# Altium PCB powermodule.PcbDoc (part 1 of 2)
Units mil, origin at the board's own origin, x right, y up, seen from the top; angles counter-clockwise.
Board outline 3937.01 x 1771.65 mil, 2 copper layers (Top, Bottom); 128 components, 96 nets, 567 pads, 424 vias.
Unrouted connection lines stored in the file: 69.
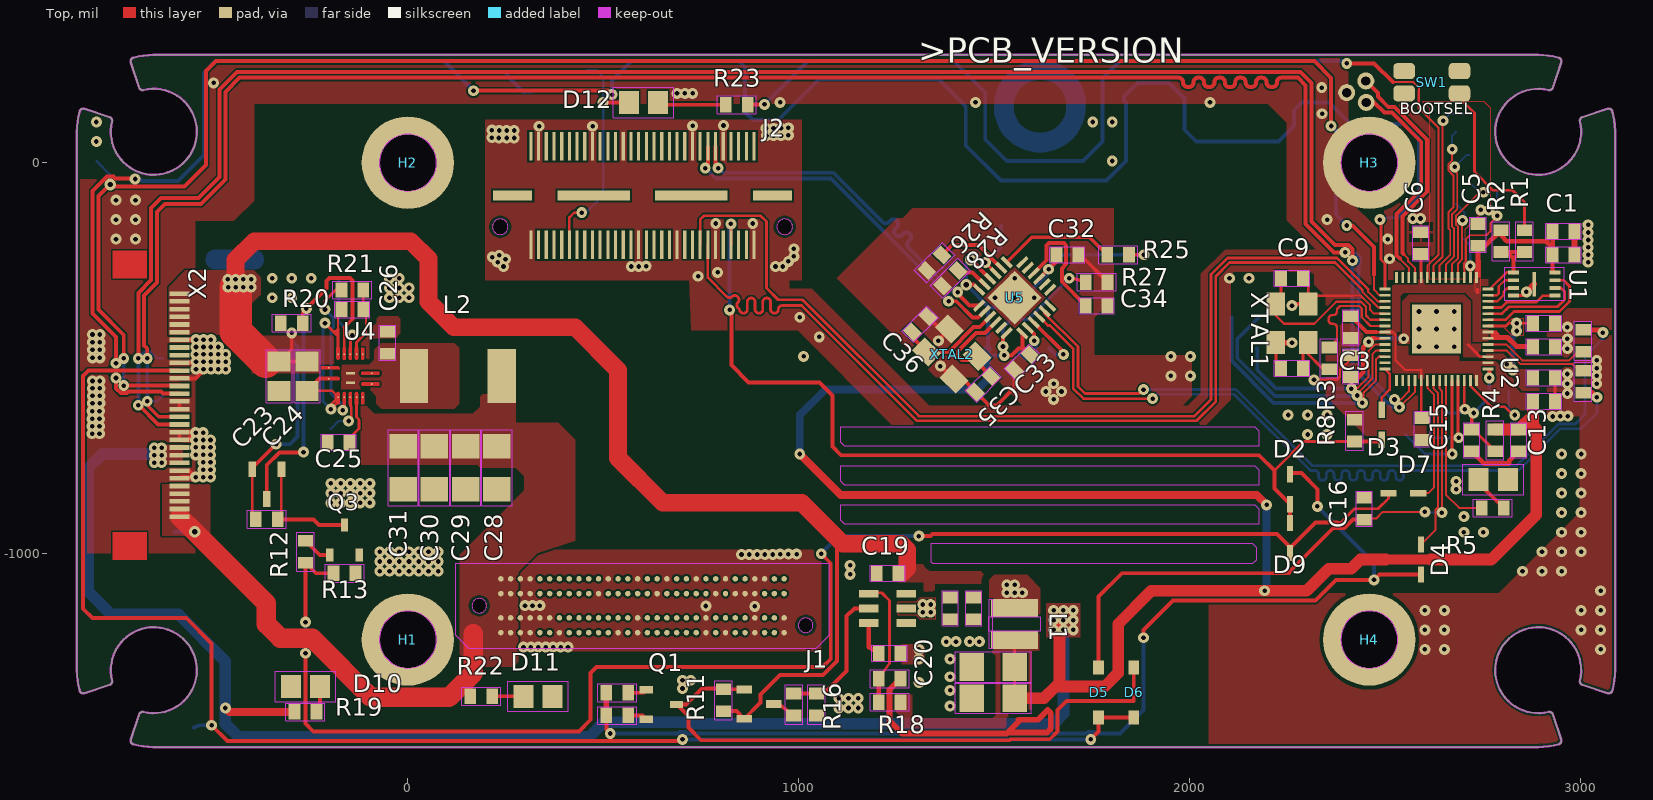
[diagram p0: Top view]
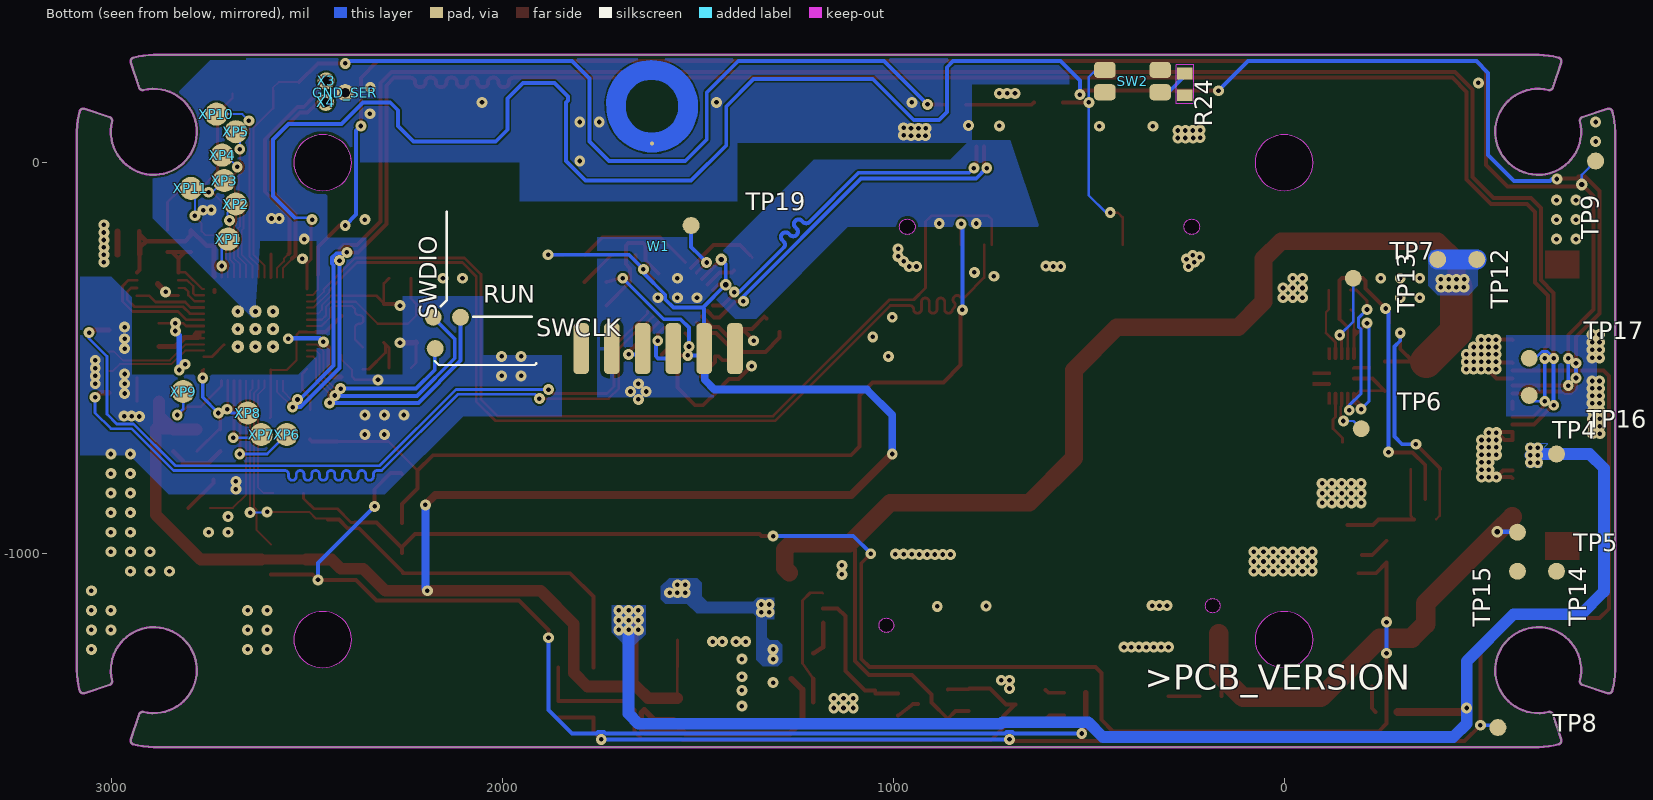
[diagram p1: Bottom view, seen from below]

## Layer stack, top to bottom
Top Solder: solder mask 0.4, Solder Resist, Dk 3.5
Top: signal copper 1.378
Dielectric 1: dielectric 12.6, FR-4, Dk 4.8
Bottom: signal copper 1.378
Bottom Solder: solder mask 0.4, Solder Resist, Dk 3.5

## Board outline
2945.67,268.85 cw(c2942.63,259.48) 2951.96,256.32 2930.7,192.49 cw(c2921.37,195.61) 2919.28,186 2918.49,186.19 ccw(c2892.95,79.19) 2858.19,-25.17 2867.42,-27.8 ccw(c2892.96,79.19) 2999.82,105.29 cw(c3009.38,107.61) 3006.27,116.94 3070.13,138.21 cw(c3073.25,128.87) 3082.79,131.29 cw(c2892.92,79.2) 3089.06,96.32 3089.81,79.19 3089.81,-1298.76 cw(c2892.96,-1298.74) 3082.5,-1351.89 3082.47,-1351.88 cw(c3073.24,-1348.44) 3070.13,-1357.78 3006.27,-1336.51 cw(c3009.39,-1327.17) 2999.82,-1324.83 ccw(c2892.96,-1298.75) 2792.02,-1255.03 2788.59,-1263.99 ccw(c2892.96,-1298.76) 2919.03,-1405.63 cw(c2921.37,-1415.19) 2930.71,-1412.07 2951.98,-1475.94 cw(c2942.64,-1479.05) 2946.82,-1487.96 2946.88,-1488.08 cw(c2892.95,-1298.76) 2892.96,-1495.61 -650.35,-1495.61 -652.14,-1495.6 cw(c-650.37,-1298.76) -702.64,-1488.54 cw(c-700.03,-1479.05) -709.37,-1475.94 -688.1,-1412.07 cw(c-678.76,-1415.19) -676.42,-1405.63 ccw(c-650.35,-1298.76) -545.98,-1263.99 -549.41,-1255.03 ccw(c-650.35,-1298.75) -757.22,-1324.83 cw(c-766.78,-1327.17) -763.66,-1336.51 -827.53,-1357.78 cw(c-830.64,-1348.44) -840.13,-1351.05 cw(c-650.38,-1298.77) -847.2,-1298.76 -847.2,79.19 cw(c-650.34,79.21) -840.13,131.49 cw(c-830.64,128.87) -827.53,138.21 -763.66,116.94 cw(c-766.78,107.61) -757.22,105.27 ccw(c-650.35,79.19) -549.41,35.46 -545.98,44.43 ccw(c-650.34,79.19) -676.42,186.06 cw(c-678.76,195.63) -688.1,192.51 -709.37,256.37 cw(c-700.03,259.48) -702.64,268.97 cw(c-650.33,79.2) -652.14,276.04 -650.35,276.04 2892.96,276.04 cw(c2892.96,79.2)
cut-out: 0,-72.83 ccw(c0,0) 72.83,0 ccw(c0,0) 0,72.84 ccw(c0,0) -72.84,0 ccw(c0,0)
cut-out: 0,-1293.31 ccw(c0,-1220.48) 72.83,-1220.48 ccw(c0,-1220.48) 0,-1147.64 ccw(c0,-1220.48) -72.84,-1220.48 ccw(c0,-1220.48)
cut-out: 2460.63,-1293.31 ccw(c2460.63,-1220.48) 2533.47,-1220.48 ccw(c2460.63,-1220.48) 2460.63,-1147.64 ccw(c2460.63,-1220.48) 2387.8,-1220.48 ccw(c2460.63,-1220.48)
cut-out: 2460.63,-72.83 ccw(c2460.63,0) 2533.47,0 ccw(c2460.63,0) 2460.63,72.84 ccw(c2460.63,0) 2387.8,0 ccw(c2460.63,0)
cut-out: 236.4,-183.86 ccw(c236.4,-163.86) 256.4,-163.86 ccw(c236.4,-163.86) 236.4,-143.86 ccw(c236.4,-163.86) 216.4,-163.86 ccw(c236.4,-163.86)
cut-out: 964.4,-183.86 ccw(c964.4,-163.86) 984.4,-163.86 ccw(c964.4,-163.86) 964.4,-143.86 ccw(c964.4,-163.86) 944.4,-163.86 ccw(c964.4,-163.86)
cut-out: 182.69,-1152.56 ccw(c182.69,-1133.86) 201.39,-1133.86 ccw(c182.69,-1133.86) 182.69,-1115.16 ccw(c182.69,-1133.86) 163.99,-1133.86 ccw(c182.69,-1133.86)
cut-out: 1018.13,-1202.56 ccw(c1018.13,-1183.86) 1036.83,-1183.86 ccw(c1018.13,-1183.86) 1018.13,-1165.16 ccw(c1018.13,-1183.86) 999.43,-1183.86 ccw(c1018.13,-1183.86)

## Design rules (kind name [scope] priority, off if disabled: settings)
BoardOutlineClearance mdCopperDimension [All] p1: gap=10 ignorepadtopadclearanceinfootprint=FALSE except(0: Arc-SplitContinuation Track-SplitContinuation SMDPad-SplitContinuation THPad-SplitContinuation Via-SplitContinuation Fill-SplitContinuation Poly-SplitContinuation Region-SplitContinuation Text-SplitContinuation; 7.87: Poly-OutlineEdge Poly-CavityEdge Poly-CutoutEdge Poly-SplitBarrior)
Clearance Clearance_for_PolygonClass_Isolate_16 [InPolygonClass('Isolate_16') vs IsArc Or IsTrack Or IsPad Or IsVia Or IsFill Or IsRegion Or IsText] p1: gap=16 ignorepadtopadclearanceinfootprint=FALSE
Clearance Clearance_for_PolygonClass_Isolate_20 [InPolygonClass('Isolate_20') vs IsArc Or IsTrack Or IsPad Or IsVia Or IsFill Or IsRegion Or IsText] p2: gap=20 ignorepadtopadclearanceinfootprint=FALSE
Clearance Clearance_for_PolygonClass_Isolate_10 [InPolygonClass('Isolate_10') vs IsArc Or IsTrack Or IsPad Or IsVia Or IsFill Or IsRegion Or IsText] p3: gap=10 ignorepadtopadclearanceinfootprint=FALSE
Clearance "Clearance (Same Net)" [All] p4: gap=5 ignorepadtopadclearanceinfootprint=FALSE
Clearance [All] p5: gap=5 ignorepadtopadclearanceinfootprint=FALSE
DiffPairsRouting DiffPair_DiffPairsRouting [All] p1: maxlimit=10 minlimit=10 mostfreqgap=10 toplayer_minwidth=15 toplayer_maxwidth=15 toplayer_prefwidth=15 bottomlayer_minwidth=15 bottomlayer_maxwidth=15 bottomlayer_prefwidth=15 maxuncoupledlength=500
DiffPairsRouting [All] p2: maxlimit=10 minlimit=10 mostfreqgap=10 toplayer_minwidth=15 toplayer_maxwidth=15 toplayer_prefwidth=15 bottomlayer_minwidth=15 bottomlayer_maxwidth=15 bottomlayer_prefwidth=15 maxuncoupledlength=500
HoleSize "HoleSize_For_NetClass_dif pairs" [InNetClass('dif pairs')] p1: absolutevalues=TRUE maxlimit=0 minlimit=0 maxpercent=80.000 minpercent=20.000
HoleSize [All] p2: absolutevalues=TRUE maxlimit=100000 minlimit=11.81 maxpercent=80.000 minpercent=20.000
HoleToHoleClearance mdDrill [All] p1: gap=6 allowstackedmicrovias=TRUE
MatchedLengths DiffPair_MatchedLengths [All] p1: tolerance=1000 checknetsindiffpair=FALSE checkdiffpairvsdiffpair=TRUE checkxsignals=TRUE checkothers=TRUE
MinimumSolderMaskSliver [All] p1 off: minsoldermaskwidth=10
PasteMaskExpansion Expansion_SMDPaste_OFF [InPadClass('SMDPaste_OFF')] p1: expansion=0
PasteMaskExpansion mlMinCreamFrame [All] p2: expansion=0
PolygonConnect PolygonConnect_For_PolygonThermal_ON_Width100000_Gap100000 [InPolygonClass('PolygonThermal_ON_Width100000_Gap100000') vs Not IsVia] p1: connectstyle=Relief reliefconductorwidth=10 reliefentries=4 polygonreliefangle="90 Angle" airgapwidth=10
PolygonConnect PolygonConnect_For_PolygonThermal_ON_Width50000_Gap100000 [InPolygonClass('PolygonThermal_ON_Width50000_Gap100000') vs Not IsVia] p2: connectstyle=Relief reliefconductorwidth=5 reliefentries=4 polygonreliefangle="90 Angle" airgapwidth=10
PolygonConnect PolygonConnect_For_PolygonThermal_ON_Width60000_Gap100000 [InPolygonClass('PolygonThermal_ON_Width60000_Gap100000') vs Not IsVia] p3: connectstyle=Relief reliefconductorwidth=6 reliefentries=4 polygonreliefangle="90 Angle" airgapwidth=10
PolygonConnect PolygonConnect_For_PolygonThermal_ON_Width200000_Gap100000 [InPolygonClass('PolygonThermal_ON_Width200000_Gap100000') vs Not IsVia] p4: connectstyle=Relief reliefconductorwidth=20 reliefentries=4 polygonreliefangle="90 Angle" airgapwidth=10
PolygonConnect PolygonConnect_For_PolygonThermal_ON_Width70000_Gap100000 [InPolygonClass('PolygonThermal_ON_Width70000_Gap100000') vs Not IsVia] p5: connectstyle=Relief reliefconductorwidth=7 reliefentries=4 polygonreliefangle="90 Angle" airgapwidth=10
PolygonConnect PolygonConnect_For_PolygonThermal_OFF [InPolygonClass('PolygonThermal_OFF')] p6: connectstyle=Direct reliefconductorwidth=10 reliefentries=4 polygonreliefangle="90 Angle" airgapwidth=10
PolygonConnect ThermalVias [IsVia] p7: connectstyle=Direct reliefconductorwidth=10 reliefentries=4 polygonreliefangle="90 Angle" airgapwidth=10
PolygonConnect [All] p8: connectstyle=Relief reliefconductorwidth=10 reliefentries=4 polygonreliefangle="90 Angle" airgapwidth=10
RoutingVias [All] p1: holewidth=11.81 width=17.81 viastyle="Through Hole" minholewidth=11.81 minwidth=17.81 maxholewidth=100 maxwidth=100
SolderMaskExpansion Expansion_SMDSolder_OFF [InPadClass('SMDSolder_OFF')] p1: expansion=0 istentingtop=FALSE
SolderMaskExpansion mlMinStopFrame [All] p2: expansion=4 istentingtop=FALSE
Width "Width_For_NetClass_dif pairs" [InNetClass('dif pairs')] p1: maxlimit=10 minlimit=99999 preferedwidth=5 toplayer_minwidth=0 bottomlayer_minwidth=0 minimp=50.000000 maximp=50.000000 favimp=50.000000
Width [All] p2: maxlimit=10 minlimit=5 preferedwidth=5
25 further rules are at their usual default settings.

## Classes and differential pairs
polygon class PolygonThermal_ON_Width100000_Gap100000: Polygon_13_Net_GND
polygon class PolygonThermal_ON_Width50000_Gap100000: Polygon_2_Net_+1V1 Polygon_3_Net_+1V1 Polygon_15_Net_GND Polygon_16_Net_GND
polygon class PolygonThermal_ON_Width200000_Gap100000: Polygon_6_Net_+3V3
polygon class PolygonThermal_ON_Width70000_Gap100000: Polygon_3_Net_N$8 Polygon_7_Net_+3V3 Polygon_8_Net_+3V3 Polygon_8_Net_GND Polygon_10_Net_GND Polygon_11_Net_GND Polygon_12_Net_GND Polygon_14_Net_GND Polygon_18_Net_GND
polygon class PolygonThermal_OFF: Polygon_1_Net_+1V1 Polygon_1_Net_+3V3 Polygon_1_Net_+5V Polygon_1_Net_+12V Polygon_1_Net_GND Polygon_1_Net_N$2 Polygon_1_Net_N$8 Polygon_1_Net_N$19 Polygon_2_Net_+3V3 Polygon_2_Net_+5V Polygon_2_Net_+12V Polygon_2_Net_N$8 Polygon_3_Net_+3V3 Polygon_3_Net_+5V Polygon_3_Net_+12V Polygon_4_Net_+3V3 Polygon_4_Net_+12V Polygon_4_Net_GND Polygon_4_Net_N$8 Polygon_5_Net_+3V3 Polygon_5_Net_GND Polygon_5_Net_N$8 Polygon_7_Net_GND Polygon_9_Net_GND Polygon_17_Net_GND
polygon class Isolate_20: Polygon_1_Net_+12V
polygon class Isolate_10: Polygon_1_Net_N$8
pad class SMDSolder_OFF: W1-P$1 X2-1 X2-2 X2-3 X2-4 X2-5 X2-6 X2-7 X2-8 X2-9 X2-10 X2-11 X2-12 X2-13 X2-14 X2-15 X2-16 X2-17 X2-18 X2-19 X2-20 X2-21 X2-22 X2-23 X2-24 X2-25 X2-26 X2-27 X2-28 X2-29 X2-30
pad class SMDPaste_OFF: -TP H1-P$1 H2-P$1 H3-P$1 H4-P$1 SWCLK-TP SWDIO-TP TP4-TP TP5-TP TP6-TP TP7-TP TP8-TP TP9-TP TP12-TP TP13-TP TP14-TP TP15-TP TP16-TP TP17-TP TP19-TP U2-57 W1-P$1 X2-1 X2-2 X2-3 X2-4 X2-5 X2-6 X2-7 X2-8 X2-9 X2-10 X2-11 X2-12 X2-13 X2-14 X2-15 X2-16 X2-17 X2-18 X2-19 X2-20 X2-21 X2-22 X2-23 X2-24 X2-25 X2-26 X2-27 X2-28 X2-29 X2-30
net class "dif pairs": D_N D_P USB_D_N USB_D_P

## Components (designator, comment, footprint, x,y, rotation, side; value= is the part's Value field where it differs from the comment)
C1 "100nF" C0603 2957.8,-175.61 r0 top
C2 "2u2F" C0603 2957.8,-235.61 r0 top
C3 "100nF" C0603 2412.8,-420.61 r90 top
C4 "2u2F" C0603 2907.8,-550.61 r180 top
C5 "100nF" C0603 2738.8,-184.61 r90 top
C6 "100nF" C0603 2592.8,-205.61 r90 top
C7 "2u2F" C0603 2907.8,-610.61 r180 top
C8 "100nF" C0603 2412.8,-520.61 r90 top
C9 "10pF" C0603 2262.8,-295.61 r180 top
C10 "10pF" C0603 2262.8,-525.61 r180 top
C11 "2u2F" C0603 2722.8,-710.61 r90 top
C12 "100nF" C0603 2907.8,-470.61 r0 top
C13 "100nF" C0603 2842.8,-710.61 r270 top
C14 "100nF" C0603 2907.8,-410.61 r180 top
C15 "100nF" C0603 2595.8,-681.61 r90 top
C16 "100nF" C0603 2447.8,-885.61 r90 top
C17 "10uF" C0603 1387.8,-1140.61 r270 top
C18 "10uF" C0603 1447.8,-1140.61 r270 top
C19 "100nF" C0603 1227.8,-1050.61 r180 top
C20 "100nF" C0603 1232.8,-1255.61 r0 top
C21 "22uF" C1206 1497.8,-1370.61 r180 top
C22 "22uF" C1206 1497.8,-1290.61 r180 top
C23 "10uF" C0805 -329.44,-546.4 r270 top
C24 "10uF" C0805 -257.71,-546.4 r270 top
C25 "4u7F" C0603 -177.2,-715.61 r180 top
C26 "100nF" C0603 -52.2,-460.61 r270 top
C27 "2u2F" C0603 -142.2,-375.61 r180 top
C28 "22uF" C1206 227.8,-780.61 r270 top
C29 "22uF" C1206 147.8,-780.61 r270 top
C30 "22uF" C1206 67.8,-780.61 r270 top
C31 "22uF" C1206 -12.2,-780.61 r270 top
C32 "1uF" C0603 1687.8,-235.61 r0 top
C33 "100nF" C0603 1572.8,-510.61 r225 top
C34 "1uF" C0603 1762.8,-365.61 r0 top
C35 "10pF" C0603 1472.8,-566.61 r225 top
C36 "10pF" C0603 1310.8,-413.61 r225 top
D1 "YL" LED_0805 2777.8,-810.61 r0 top
D2 "1N4148WS" SOD323_NEX-L 2257.8,-835.61 r270 top
D3 "1N4148WS" SOD323_NEX-L 2492.8,-670.61 r90 top
D4 "1N4148WS" SOD323_NEX-L 2592.8,-1015.61 r90 top
D5 "" SOD-123_ONS-L 1767.8,-1355.61 r90 top
D6 "" SOD-123_ONS-L 1857.8,-1355.61 r90 top
D7 "1N4148WS" SOD323_NEX-L 2547.8,-845.61 r0 top
D9 "1N4148WS" SOD323_NEX-L 2257.8,-960.61 r90 top
D10 "GN" LED_0805 -262.2,-1340.61 r180 top
D11 "BL" LED_0805 332.8,-1365.61 r0 top
D12 "YL" LED_0805 602.8,154.39 r180 top
GND_SER "" TH-0.75/0.6 2402.8,179.39 r180 bottom
H1 "" SMT_SPACER_5MMX2.5M 0,-1220.48 r0 top
H2 "" SMT_SPACER_5MMX2.5M 0,0 r0 top
H3 "" SMT_SPACER_5MMX2.5M 2460.63,0 r0 top
H4 "" SMT_SPACER_5MMX2.5M 2460.63,-1220.48 r0 top
J1 "ADM6-30-01.5-L-4-2-A-TR" SAMTEC_ADM6-30-01.5-L-4-2-A-TR 600.41,-1133.86 r180 top
J2 "QTH-030-01-L-D-ACONN_QTH-030-02-L-D-A-K-FR_S00" CONN_QTH-030-02-L-D-A-K-FR_S00 600.4,-83.86 r0 top
L1 "VLS3012HBX-3R3MIND_VLS3012HBX-3R3M_TDK-L" IND_VLS3012HBX-3R3M_TDK-L 1552.8,-1180.61 r90 top
L2 "" HA72L-06301R5LFTR 127.8,-545.61 r180 top
Q1 "2N7002,215TO-236AB_NEX-L" TO-236AB_NEX-L 648.8,-1386.61 r270 top
Q2 "SI2301CDS-T1-GE3TO-236_VIS-L" TO-236_VIS-L 898.8,-1385.61 r270 top
Q3 "2N7002,215TO-236AB_NEX-L" TO-236AB_NEX-L -162.2,-965.61 r0 top
Q4 "SI2301CDS-T1-GE3TO-236_VIS-L" TO-236_VIS-L -361.2,-822.61 r180 top
R1 "1K" R0603 2857.8,-200.61 r270 top
R2 "10k" R0603 2797.8,-200.61 r90 top
R3 "1K" R0603 2357.8,-500.61 r270 top
R4 "200R" R0603 2782.8,-710.61 r90 top
R5 "200R" R0603 2776.8,-883.61 r180 top
R6 "27R" R0603 3007.8,-560.61 r270 top
R7 "27R" R0603 3007.8,-455.61 r90 top
R8 "10k" R0603 2422.8,-685.61 r270 top
R9 "4k7" R0603 535.8,-1356.61 r180 top
R10 "100k" R0603 535.8,-1414.61 r0 top
R11 "100k" R0603 807.8,-1375.61 r90 top
R12 "4k7" R0603 -262.2,-995.61 r270 top
R13 "100k" R0603 -162.2,-1050.61 r0 top
R14 "100k" R0603 -361.2,-912.61 r0 top
R15 "10k" R0603 987.8,-1386.61 r90 top
R16 "100k" R0603 1045.8,-1386.61 r90 top
R17 "10k" R0603 1232.8,-1320.61 r180 top
R18 "33k2" R0603 1232.8,-1380.61 r0 top
R19 "200R" R0603 -262.2,-1405.61 r180 top
R20 "100k" R0603 -297.2,-410.61 r0 top
R21 "100k" R0603 -142.2,-325.61 r0 top
R22 "200R" R0603 187.8,-1365.61 r180 top
R23 "200R" R0603 841.8,148.39 r0 top
R24 "1K" R0603 253.8,200.39 r270 bottom
R25 "50k" R0603 1817.8,-235.61 r0 top
R26 "50k" R0603 1347.8,-255.61 r225 top
R27 "12k" R0603 1762.8,-305.61 r0 top
R28 "50k" R0603 1387.8,-295.61 r225 top
SW1 "" EVQ-P7J01P 2549.8,177.39 r0 top
SW2 "FASTBOOT" EVQ-P7J01P 458.8,180.39 r180 bottom
SWCLK "TPTP11R" TP11R 2172.8,-475.61 r90 bottom
SWDIO "TPTP11R" TP11R 2177.8,-395.61 r270 bottom
TP4 "TPTP11R" TP11R -697.2,-745.61 r180 bottom
TP5 "TPTP11R" TP11R -597.2,-945.61 r180 bottom
TP6 "TPTP11R" TP11R -197.2,-680.61 r180 bottom
TP7 "TPTP11R" TP11R -177.2,-295.61 r180 bottom
TP8 "TPTP11R" TP11R -547.2,-1445.61 r180 bottom
TP9 "TPTP11R" TP11R -797.2,4.39 r180 bottom
TP11 "TPTP11R" TP11R 2107.8,-395.61 r270 bottom
TP12 "TPTP11R" TP11R -493.2,-247.61 r90 bottom
TP13 "TPTP11R" TP11R -393.2,-247.61 r90 bottom
TP14 "TPTP11R" TP11R -697.2,-1045.61 r270 bottom
TP15 "TPTP11R" TP11R -597.2,-1045.61 r270 bottom
TP16 "TPTP11R" TP11R -627.2,-595.61 r270 bottom
TP17 "TPTP11R" TP11R -627.2,-500.61 r270 bottom
TP19 "TPTP11R" TP11R 1517.8,-160.61 r180 bottom
U1 "W25Q16JVUXIQW25Q16JVUXIQ_WIN-L" W25Q16JVUXIQ_WIN-L 2882.8,-310.61 r0 top
U2 "RP2040" RP2040TR7_RPI-L 2632.8,-425.61 r270 top
U3 "TPS563201DDCR" DDC0006A_L 1227.8,-1140.61 r180 top
U4 "RT7291AGQUF" RT7291AGQUF -147.2,-545.61 r0 top
U5 "USB2422/MJ_SQFN-4X4" SQFN24_4X4 1552.8,-345.61 r135 top
W1 "" WIFI-RTL8188EUS 1597.8,-505.61 r180 bottom
X2 "FH12-30S-0.5SH" FH12-30S-0.5SH -712.2,-620.61 r270 top
X3 "" TH-0.75/0.6 2451.8,209.39 r180 bottom
X4 "" TH-0.75/0.6 2452.8,154.39 r180 bottom
XP1 "" SMT-PAD_R1-5MM 2702.8,-195.61 r180 bottom
XP2 "" SMT-PAD_R1-5MM 2682.8,-105.61 r180 bottom
XP3 "" SMT-PAD_R1-5MM 2712.8,-45.61 r180 bottom
XP4 "" SMT-PAD_R1-5MM 2717.8,19.39 r180 bottom
XP5 "" SMT-PAD_R1-5MM 2682.8,79.39 r180 bottom
XP6 "" SMT-PAD_R1-5MM 2552.8,-695.61 r180 bottom
XP7 "" SMT-PAD_R1-5MM 2617.8,-695.61 r180 bottom
XP8 "" SMT-PAD_R1-5MM 2652.8,-640.61 r180 bottom
XP9 "" SMT-PAD_R1-5MM 2817.8,-585.61 r180 bottom
XP10 "" SMT-PAD_R1-5MM 2732.8,124.39 r180 bottom
XP11 "" SMT-PAD_R1-5MM 2797.8,-65.61 r180 bottom
XTAL1 "12MHz" SMD3225_3.2X2.5X0.7_MTC-L 2262.8,-410.61 r0 top
XTAL2 "" SMD3225_3.2X2.5X0.7_MTC-L 1391.8,-489.61 r225 top

## Footprints (in the part's own frame and the unit in brackets; to place one, negate y for a bottom-side part, rotate by r counter-clockwise, add the part's x,y. Pads: shape width x height; smd on the part's side, far side on the other; paste and mask are expansions set on the pad)
C0603 [mil] "C0603"
  rect 30x39.4 smd: 1(-28,0) 2(28,0)
  Top keep-out lines w2: -44.96,-20.56 -44.96,20.56 44.96,20.56 44.96,-20.56 -44.96,-20.56
C0805 [mil] "C0805"
  rect 51.18x59.06 smd: 1(-37.4,0) 2(37.4,0)
  Top keep-out lines w2: 67.68,-33.7 67.68,33.7 -67.68,33.7 -67.68,-33.7 67.68,-33.7
C1206 [mil] "C1206"
  rect 62.99x70.87 smd: 1(-55.12,0) 2(55.12,0)
  Top keep-out lines w2: 97.36,38.7 97.36,-38.7 -97.36,-38.7 -97.36,38.7 97.36,38.7
CONN_QTH-030-02-L-D-A-K-FR_S00 [mil] "CONN_QTH-030-02-L-D-A-K-FR_S00"
  rect 8x72 smd: 1(285.51,-126) 2(285.51,126) 3(265.82,-126) 4(265.82,126) 5(246.13,-126) 6(246.13,126) 7(226.44,-126) 8(226.44,126) 9(206.75,-126) 10(206.75,126) 11(187.06,-126) 12(187.06,126) 13(167.37,-126) 14(167.37,126) 15(147.68,-126) 16(147.68,126) 17(127.99,-126) 18(127.99,126) 19(108.3,-126) 20(108.3,126) 21(88.6,-126) 22(88.6,126) 23(68.92,-126) 24(68.92,126) 25(49.23,-126) 26(49.23,126) 27(29.53,-126) 28(29.53,126) 29(9.85,-126) 30(9.85,126) 31(-9.85,-126) 32(-9.85,126) 33(-29.53,-126) 34(-29.53,126) 35(-49.23,-126) 36(-49.23,126) 37(-68.92,-126) 38(-68.92,126) 39(-88.6,-126) 40(-88.6,126) 41(-108.3,-126) 42(-108.3,126) 43(-127.99,-126) 44(-127.99,126) 45(-147.68,-126) 46(-147.68,126) 47(-167.37,-126) 48(-167.37,126) 49(-187.06,-126) 50(-187.06,126) 51(-206.75,-126) 52(-206.75,126) 53(-226.44,-126) 54(-226.44,126) 55(-246.13,-126) 56(-246.13,126) 57(-265.82,-126) 58(-265.82,126) 59(-285.51,-126) 60(-285.51,126)
  rect 185x25 smd: 61(125,0) 62(-125,0)
  rect 100x25 smd: 63(332.5,0) 64(-332.5,0)
DDC0006A_L [mil] "DDC0006A_L"
  rect 50x20 smd: 1(-48,37.4) 2(-48,0) 3(-48,-37.4) 4(48,-37.4) 5(48,0) 6(48,37.4)
EVQ-P7J01P [mil] "EVQ-P7J01P"
  rrect50% 55.12x41.34 smd: 1(0,57.09) 2(141.73,57.09) 3(0,0) 4(141.73,0)
FH12-30S-0.5SH [mil] "FH12-30S-0.5SH"
  rect 11.81x51.18 smd paste+0 mask+0: 1(-285.43,127.95) 2(-265.75,127.95) 3(-246.06,127.95) 4(-226.38,127.95) 5(-206.69,127.95) 6(-187.01,127.95) 7(-167.32,127.95) 8(-147.64,127.95) 9(-127.95,127.95) 10(-108.27,127.95) 11(-88.58,127.95) 12(-68.9,127.95) 13(-49.21,127.95) 14(-29.53,127.95) 15(-9.84,127.95) 16(9.84,127.95) 17(29.53,127.95) 18(49.21,127.95) 19(68.9,127.95) 20(88.58,127.95) 21(108.27,127.95) 22(127.95,127.95) 23(147.64,127.95) 24(167.32,127.95) 25(187.01,127.95) 26(206.69,127.95) 27(226.38,127.95) 28(246.06,127.95) 29(265.75,127.95) 30(285.43,127.95)
  Top region: -324.8,43.31 -324.8,-43.31 -395.67,-43.31 -395.67,43.31
  Top region: 395.67,43.31 395.67,-43.31 324.8,-43.31 324.8,43.31
HA72L-06301R5LFTR [mil] "HA72L-06301R5LFTR"
  rect 72.83x137.8 smd: P$1(-112.2,0) P$2(112.2,0)
IND_VLS3012HBX-3R3M_TDK-L [mil] "IND_VLS3012HBX-3R3M_TDK-L"
  rect 46x120 smd: 1(-41,0) 2(41,0)
  Top keep-out region: -62,56 62,56 62,66 -62,66
  Top keep-out region: -19,66 19,66 19,-66 -19,-66
  Top keep-out region: -19,66 19,66 19,-66 -19,-66
LED_0805 [mil] "LED_0805"
  rect 51.18x59.06 smd: A(-37.4,0) C(37.4,0)
  Top keep-out lines w2: -77.68,-38.7 -77.68,38.7 77.68,38.7 77.68,-38.7 -77.68,-38.7
R0603 [mil] "R0603"
  rect 30x39.4 smd: 1(-28,0) 2(28,0)
  Top keep-out lines w2: 49.96,-22.56 -49.96,-22.56 -49.96,22.56 49.96,22.56 49.96,-22.56
RP2040TR7_RPI-L [mil] "RP2040TR7_RPI-L"
  rect 28x7 smd: 1(-132,102.38) 2(-132,86.63) 3(-132,70.88) 4(-132,55.13) 5(-132,39.38) 6(-132,23.63) 7(-132,7.88) 8(-132,-7.88) 9(-132,-23.63) 10(-132,-39.38) 11(-132,-55.13) 12(-132,-70.88) 13(-132,-86.63) 14(-132,-102.38) 29(132,-102.38) 30(132,-86.63) 31(132,-70.88) 32(132,-55.13) 33(132,-39.38) 34(132,-23.63) 35(132,-7.88) 36(132,7.88) 37(132,23.63) 38(132,39.38) 39(132,55.13) 40(132,70.88) 41(132,86.63) 42(132,102.38)
  rect 7x28 smd: 15(-102.38,-132) 16(-86.63,-132) 17(-70.88,-132) 18(-55.13,-132) 19(-39.38,-132) 20(-23.63,-132) 21(-7.88,-132) 22(7.88,-132) 23(23.63,-132) 24(39.38,-132) 25(55.13,-132) 26(70.88,-132) 27(86.63,-132) 28(102.38,-132) 43(102.38,132) 44(86.63,132) 45(70.88,132) 46(55.13,132) 47(39.38,132) 48(23.63,132) 49(7.88,132) 50(-7.88,132) 51(-23.63,132) 52(-39.38,132) 53(-55.13,132) 54(-70.88,132) 55(-86.63,132) 56(-102.38,132)
  rect 126x126 smd paste+0: 57(0,0)
  round 31.81 hole 11.81: 58(-45,45) 59(-45,0) 60(-45,-45) 61(0,-45) 62(45,-45) 63(45,0) 64(45,45) 65(0,45) 66(0,0)
RT7291AGQUF [mil] "RT7291AGQUF"
  rect 3.94x3.94 smd: P$1(-55.12,20.67) P$2(-55.12,-6.89) P$3(-31.5,-55.12) P$4(-15.75,-55.12) P$5(0,-55.12) P$6(15.75,-55.12) P$7(31.5,-55.12) P$8(55.12,-20.67) P$9(55.12,6.89) P$10(31.5,55.12) P$11(15.75,55.12) P$12(0,55.12) P$13(-15.75,55.12) P$14(-31.5,55.12)
  rect 23.62x5.91 smd: P$15(0,6.5) P$16(0,-17.13)
  Top region: -27.37,45.28 -27.37,72.28 -35.62,72.28 -35.62,45.27 -35.31,43.69 -34.4,42.34 -33.05,41.45 -31.46,41.15 -31.46,41.15 -29.41,41.71 -27.91,43.23 -27.37,45.28
  Top region: -11.62,45.28 -11.62,72.28 -19.88,72.28 -19.88,45.28 -19.57,43.7 -18.67,42.36 -17.33,41.46 -15.75,41.14 -15.75,41.14 -14.17,41.46 -12.83,42.36 -11.93,43.7 -11.62,45.28
  Top region: 4.13,45.28 4.13,72.28 -4.13,72.28 -4.13,45.28 -3.82,43.7 -2.92,42.36 -1.58,41.46 0,41.14 0,41.14 1.58,41.46 2.92,42.36 3.82,43.7 4.13,45.28
  Top region: 19.88,45.28 19.88,72.28 11.62,72.28 11.62,45.28 11.93,43.7 12.83,42.36 14.17,41.46 15.75,41.14 15.75,41.14 17.33,41.46 18.67,42.36 19.57,43.7 19.88,45.28
  Top region: 35.62,45.27 35.62,72.28 27.37,72.28 27.37,45.28 27.91,43.23 29.41,41.71 31.46,41.15 31.46,41.15 33.05,41.45 34.4,42.34 35.31,43.69 35.62,45.27
  Top region: 74.25,2.57 74.25,10.83 31.5,10.83 29.45,10.28 27.93,8.78 27.37,6.73 27.37,6.73 27.67,5.14 28.56,3.79 29.91,2.88 31.5,2.57 31.5,2.57
  Top region: 74.25,-24.8 74.25,-16.53 31.5,-16.53 29.92,-16.85 28.58,-17.75 27.68,-19.09 27.37,-20.67 27.37,-20.67 27.68,-22.25 28.58,-23.59 29.92,-24.49 31.5,-24.8 31.5,-24.8
  Top region: -74.25,-2.75 -74.25,-11.02 -31.5,-11.02 -29.92,-10.71 -28.58,-9.81 -27.68,-8.47 -27.37,-6.89 -27.37,-6.89 -27.68,-5.31 -28.58,-3.97 -29.92,-3.07 -31.5,-2.75 -31.5,-2.75
  Top region: 27.37,-45.28 27.37,-72.28 35.62,-72.28 35.62,-45.27 35.31,-43.69 34.4,-42.34 33.05,-41.45 31.46,-41.15 31.46,-41.15 29.41,-41.71 27.91,-43.23 27.37,-45.28
  Top region: 11.62,-45.28 11.62,-72.28 19.88,-72.28 19.88,-45.28 19.57,-43.7 18.67,-42.36 17.33,-41.46 15.75,-41.14 15.75,-41.14 14.17,-41.46 12.83,-42.36 11.93,-43.7 11.62,-45.28
  Top region: -4.13,-45.28 -4.13,-72.28 4.13,-72.28 4.13,-45.28 3.82,-43.7 2.92,-42.36 1.58,-41.46 0,-41.14 0,-41.14 -1.58,-41.46 -2.92,-42.36 -3.82,-43.7 -4.13,-45.28
  Top region: -19.88,-45.28 -19.88,-72.28 -11.62,-72.28 -11.62,-45.28 -11.93,-43.7 -12.83,-42.36 -14.17,-41.46 -15.75,-41.14 -15.75,-41.14 -17.33,-41.46 -18.67,-42.36 -19.57,-43.7 -19.88,-45.28
  Top region: -35.62,-45.27 -35.62,-72.28 -27.37,-72.28 -27.37,-45.28 -27.91,-43.23 -29.41,-41.71 -31.46,-41.15 -31.46,-41.15 -33.05,-41.45 -34.4,-42.34 -35.31,-43.69 -35.62,-45.27
  Top region: -74.25,24.8 -74.25,16.53 -27.37,16.53 -27.37,20.75 -31.42,24.8
SAMTEC_ADM6-30-01.5-L-4-2-A-TR [mil] "SAMTEC_ADM6-30-01.5-L-4-2-A-TR"
  rrect100% 14.02x14.02 smd: A01(362.5,68.9) A02(337.5,68.9) A03(312.5,68.9) A04(287.5,68.9) A05(262.5,68.9) A06(237.5,68.9) A07(212.5,68.9) A08(187.5,68.9) A09(162.5,68.9) A10(137.5,68.9) A11(112.5,68.9) A12(87.5,68.9) A13(62.5,68.9) A14(37.5,68.9) A15(12.5,68.9) A16(-12.5,68.9) A17(-37.5,68.9) A18(-62.5,68.9) A19(-87.5,68.9) A20(-112.5,68.9) A21(-137.5,68.9) A22(-162.5,68.9) A23(-187.5,68.9) A24(-212.5,68.9) A25(-237.5,68.9) A26(-262.5,68.9) A27(-287.5,68.9) A28(-312.5,68.9) A29(-337.5,68.9) A30(-362.5,68.9) B01(362.5,31.1) B02(337.5,31.1) B03(312.5,31.1) B04(287.5,31.1) B05(262.5,31.1) B06(237.5,31.1) B07(212.5,31.1) B08(187.5,31.1) B09(162.5,31.1) B10(137.5,31.1) B11(112.5,31.1) B12(87.5,31.1) B13(62.5,31.1) B14(37.5,31.1) B15(12.5,31.1) B16(-12.5,31.1) B17(-37.5,31.1) B18(-62.5,31.1) B19(-87.5,31.1) B20(-112.5,31.1) B21(-137.5,31.1) B22(-162.5,31.1) B23(-187.5,31.1) B24(-212.5,31.1) B25(-237.5,31.1) B26(-262.5,31.1) B27(-287.5,31.1) B28(-312.5,31.1) B29(-337.5,31.1) B30(-362.5,31.1) C01(362.5,-31.1) C02(337.5,-31.1) C03(312.5,-31.1) C04(287.5,-31.1) C05(262.5,-31.1) C06(237.5,-31.1) C07(212.5,-31.1) C08(187.5,-31.1) C09(162.5,-31.1) C10(137.5,-31.1) C11(112.5,-31.1) C12(87.5,-31.1) C13(62.5,-31.1) C14(37.5,-31.1) C15(12.5,-31.1) C16(-12.5,-31.1) C17(-37.5,-31.1) C18(-62.5,-31.1) C19(-87.5,-31.1) C20(-112.5,-31.1) C21(-137.5,-31.1) C22(-162.5,-31.1) C23(-187.5,-31.1) C24(-212.5,-31.1) C25(-237.5,-31.1) C26(-262.5,-31.1) C27(-287.5,-31.1) C28(-312.5,-31.1) C29(-337.5,-31.1) C30(-362.5,-31.1) D01(362.5,-68.9) D02(337.5,-68.9) D03(312.5,-68.9) D04(287.5,-68.9) D05(262.5,-68.9) D06(237.5,-68.9) D07(212.5,-68.9) D08(187.5,-68.9) D09(162.5,-68.9) D10(137.5,-68.9) D11(112.5,-68.9) D12(87.5,-68.9) D13(62.5,-68.9) D14(37.5,-68.9) D15(12.5,-68.9) D16(-12.5,-68.9) D17(-37.5,-68.9) D18(-62.5,-68.9) D19(-87.5,-68.9) D20(-112.5,-68.9) D21(-137.5,-68.9) D22(-162.5,-68.9) D23(-187.5,-68.9) D24(-212.5,-68.9) D25(-237.5,-68.9) D26(-262.5,-68.9) D27(-287.5,-68.9) D28(-312.5,-68.9) D29(-337.5,-68.9) D30(-362.5,-68.9)
  Top keep-out lines w1.97: 477.76,75.51 477.76,-108.27 -477.76,-108.27 -477.76,75.51 -445,108.27 445,108.27 477.76,75.51
SMD3225_3.2X2.5X0.7_MTC-L [mil] "SMD3225_3.2X2.5X0.7_MTC-L"
  rect 47x59 smd: 1(-41.5,49.5) 2(-41.5,-49.5) 3(41.5,-49.5) 4(41.5,49.5)
SMT-PAD_R1-5MM [mil] "SMT-PAD_R1-5MM"
  rrect100% 59.06x59.06 smd: P$1(0,0)
SMT_SPACER_5MMX2.5M [mm] "SMT_SPACER_5MMX2.5M"
  rrect100% 6x6 smd paste+0: P$1(0,0)
SOD323_NEX-L [mil] "SOD323_NEX-L"
  rect 41.5x16 smd: 1(-38.25,0) 2(38.25,0)
SOD-123_ONS-L [mil] "SOD-123_ONS-L"
  rect 36x28 smd: 1(-64,0) 2(64,0)
SQFN24_4X4 [mil] "SQFN24_4X4"
  rect 36x10 smd: 1(-78.5,50) 2(-78.5,30) 3(-78.5,10) 4(-78.5,-10) 5(-78.5,-30) 6(-78.5,-50) 13(78.5,-50) 14(78.5,-30) 15(78.5,-10) 16(78.5,10) 17(78.5,30) 18(78.5,50)
  rect 10x36 smd: 7(-50,-78.5) 8(-30,-78.5) 9(-10,-78.5) 10(10,-78.5) 11(30,-78.5) 12(50,-78.5) 19(50,78.5) 20(30,78.5) 21(10,78.5) 22(-10,78.5) 23(-30,78.5) 24(-50,78.5)
  rect 98x98 smd: 25(0,0)
TH-0.75/0.6 [mil] "TH-0.75/0.6"
  round 43.62 hole 23.62: P$2(0,0)
TO-236_VIS-L [mil] "TO-236_VIS-L"
  rect 20x40 smd: 1(-37.4,-38) 2(37.4,-38) 3(0,38)
TO-236AB_NEX-L [mil] "TO-236AB_NEX-L"
  rect 19x34 smd: 1(-37.5,-38.5) 2(37.5,-38.5) 3(0,38.5)
TP11R [mil] "TP11R"
  rrect100% 43.31x43.31 smd paste+0: TP(0,0)
W25Q16JVUXIQ_WIN-L [mil] "W25Q16JVUXIQ_WIN-L"
  rect 28x10 smd: 1(-53.06,29.53) 2(-53.06,9.84) 3(-53.06,-9.84) 4(-53.06,-29.53) 5(53.06,-29.53) 6(53.06,-9.84) 7(53.06,9.84) 8(53.06,29.53)
  rect 8x63 smd: 9(0,0)
  Top keep-out region: -75.06,-42.5 -75.06,42.5 75.06,42.5 75.06,-42.5
WIFI-RTL8188EUS [mil] "WIFI-RTL8188EUS"
  rrect50% 40x130 smd: GND(-122.72,30) IO1(192.24,30) IO2(-201.46,30) USB-DM(34.76,30) USB-DP(-43.98,30) VDD33(113.5,30)
  rrect100% 10x10 smd paste+0 mask+0: P$1(-20,555)
  Top region: -87.45,651.5 -83.36,676.56 -69.78,698.01 -48.88,712.42 -24,717.5 -24,717.5 -19,717.5 6.45,712.44 28.02,698.02 42.44,676.45 47.5,651 47.5,651 47.5,650 47.5,649 42.44,623.55 28.02,601.98 6.45,587.56 -19,582.5 -19,582.5 -22,582.5 -47.64,587.73 -69.19,602.58 -83.21,624.68 -87.45,650.5 -87.45,650.5 -136.47,650.5 -128.41,605.54 -103.55,567.22 -65.78,541.53 -21,532.5 -21,532.5 -19,532.5 25.58,541.37 63.38,566.62 88.63,604.42 97.5,649 97.5,649 97.5,650 88.56,694.97 63.09,733.09 24.97,758.56 -20,767.5 -20,767.5 -21,767.5 -24,767.5 -68.01,758.62 -105.14,733.37 -129.56,695.7 -137.47,651.5 -137.47,651.5

## Part data
C1 C2 C3 C4 C5 C6 C7 C8 C9 C10 C11 C12 C13 C14 C15 C16 C17 C18 C19 C20 C25 C26 C27 C32 C33 C34 C35 C36: library part C0603, PackageName=C0603
C21 C22 C28 C29 C30 C31: library part C1206, PackageName=C1206
C23 C24: library part C0805, PackageName=C0805
D1 D10 D11 D12: library part LED_0805, PackageName=LED_0805
D2 D3 D4 D7 D9: library part SOD323_NEX-L, PackageName=SOD323_NEX-L
D5 D6: library part SOD-123_ONS-L, PackageName=SOD-123_ONS-L
GND_SER X3 X4: library part TH-0.75/0.6, PackageName=TH-0.75/0.6
H1 H2 H3 H4: library part SMT_SPACER_5MMX2.5M, PackageName=SMT_SPACER_5MMX2.5M
J1: library part SAMTEC_ADM6-30-01.5-L-4-2-A-TR, PackageName=SAMTEC_ADM6-30-01.5-L-4-2-A-TR
J2: library part CONN_QTH-030-02-L-D-A-K-FR_S00, PackageName=CONN_QTH-030-02-L-D-A-K-FR_S00
L1: library part IND_VLS3012HBX-3R3M_TDK-L, PackageName=IND_VLS3012HBX-3R3M_TDK-L
L2: library part HA72L-06301R5LFTR, PackageName=HA72L-06301R5LFTR
Q1 Q3: library part TO-236AB_NEX-L, PackageName=TO-236AB_NEX-L
Q2 Q4: library part TO-236_VIS-L, PackageName=TO-236_VIS-L
R1 R2 R3 R4 R5 R6 R7 R8 R9 R10 R11 R12 R13 R14 R15 R16 R17 R18 R19 R20 R21 R22 R23 R24 R25 R26 R27 R28: library part R0603, PackageName=R0603
SW1 SW2: library part EVQ-P7J01P, PackageName=EVQ-P7J01P
SWCLK SWDIO TP4 TP5 TP6 TP7 TP8 TP9 TP11 TP12 TP13 TP14 TP15 TP16 TP17 TP19: library part TP11R, PackageName=TP11R
U1: library part W25Q16JVUXIQ_WIN-L, PackageName=W25Q16JVUXIQ_WIN-L
U2: library part RP2040TR7_RPI-L, PackageName=RP2040TR7_RPI-L
U3: library part DDC0006A_L, PackageName=DDC0006A_L
U5: library part SQFN24_4X4, PackageName=SQFN24_4X4
W1: library part WIFI-RTL8188EUS, PackageName=WIFI-RTL8188EUS
XP1 XP2 XP3 XP4 XP5 XP6 XP7 XP8 XP9 XP10 XP11: library part SMT-PAD_R1-5MM, PackageName=SMT-PAD_R1-5MM
XTAL1 XTAL2: library part SMD3225_3.2X2.5X0.7_MTC-L, PackageName=SMD3225_3.2X2.5X0.7_MTC-L
U4: PackageName=RT7291AGQUF
X2: PackageName=FH12-30S-0.5SH

## Free pads (board coordinates)
  round 145.67 hole 145.67 unplated: MH1(0,-1220.48) MH1(0,0) MH1(2460.63,-1220.48) MH1(2460.63,0)
  round 37.4 hole 37.4 unplated: MH1(182.69,-1133.86) MH2(1018.13,-1183.86)
  round 40 hole 40 unplated: MH1(236.4,-163.86) MH2(964.4,-163.86)

## Via types
v1: diameter 27.81/27.81 (per signal layer), hole 11.81, Top to Bottom, 420 vias
v2: diameter 29.78/29.78 (per signal layer), hole 13.78, Top to Bottom, 4 vias

## Nets (pads, with @x,y where several pads share a name; then routed paths per layer and width w, separated by ;. In a path a pad name is that pad's centre, name@x,y a point inside that pad or via, vN(x,y) a via of type N, cw(c..) or ccw(c..) an arc to the next point about the centre after c; other vN are vias at no path point)
+1V1: U2.23 U2.45 U2.50 | length 588.9
  Top w7: 2474.8,-449.61 2500.43,-449.61 U2.23@2500.8,-449.24 ; 2712.8,-465.61 2743.68,-496.48 U2.45@2764.8,-496.49 ; U2.50@2764.8,-417.73 2810.68,-417.73 2817.8,-410.61 2879.8,-410.61
  Top w12: 2412.8,-548.61 2432.8,-548.61 2444.8,-536.61 2444.8,-472.61 v1(2458.8,-458.61) 2467.8,-449.61 2474.8,-449.61
  Bottom w12: v1(2458.8,-458.61) 2467.8,-449.61 2547.8,-449.61 v1(2548.8,-450.61)
  Bottom w13: v1(2812.8,-515.61) v1(2827.8,-530.61) 2827.8,-440.61 v1(2837.8,-430.61) v1(2837.8,-410.61)
+3V3: C1.1 C3.2 C5.1 C6.1 C13.1 C15.2 C32.1 C33.1 L1.1 R2.2 R4.2 R18.2 R19.2 R25.2 TP4.TP U1.8 U2.1 U2.10 U2.22 U2.33 U2.42 U2.44 U2.48 U2.49 U5.1 U5.9 U5.16 U5.18 W1.VDD33 X2.21 X2.22 X2.23 | length 10584.2
  Top w6: 2520.68,-433.48 2527.8,-440.61 2527.8,-505.61 2552.8,-530.61 2593.43,-530.61 ; U2.1@2735.18,-293.61 U2.1@2736.8,-291.99
  Top w7: L1.1@1552.8,-1221.61 1552.8,-1290.49 1552.92,-1290.61 1552.92,-1370.61 ; 2477.8,-433.61 2500.68,-433.61 U2.22@2500.8,-433.49 2520.68,-433.48 ; C6.1@2592.8,-233.61 2592.8,-292.98 U2.10@2593.42,-293.61 ; 2593.43,-530.61 U2.33@2593.42,-557.61 2593.43,-651.23 C15.2@2595.8,-653.61 ; U2.48@2764.8,-449.24 2779.18,-449.23 2787.8,-440.61 2787.8,-435.61 2785.68,-433.48 U2.49@2764.8,-433.49
  Top w10: v2(1429.04,-311.85) 1448.33,-311.85 U5.18@1461.94,-325.46 ; v2(1440.73,-247.68) U5.16@1490.22,-297.17 ; v1(1526.35,-493.07) 1545.34,-493.07 1562.8,-475.61 1577.4,-475.61 C33.1@1592.6,-490.81 1572.95,-471.16 U5.1@1572.95,-436.47 ; U5.9@1615.38,-297.17 v1(1639.87,-272.68) 1659.8,-252.75 C32.1@1659.8,-235.61 ; R25.2@1845.8,-235.61 v1(1883.71,-235.61) ; C3.2@2412.8,-392.61 2453.8,-433.61 2477.8,-433.61 ; 2552.8,-1015.61 2557.8,-1015.61 ; 2737.8,-330.61 2737.8,-325.61 ; 2929.8,-235.61 2929.8,-275.03 U1.8@2935.86,-281.08
  Top w12: U2.1@2736.8,-291.99 2738.8,-289.98 C5.1@2738.8,-212.61 2757.8,-212.61 R2.2@2797.8,-172.61 2797.8,-185.61 2812.8,-200.61 2912.8,-200.61 ; 2912.8,-200.61 2927.8,-215.61 2927.8,-233.61 2929.8,-235.61 C1.1@2929.8,-175.61 2929.8,-183.61 2912.8,-200.61
  Top w13: 2787.8,-440.61 2782.8,-435.61 2777.8,-435.61 2777.8,-444.61 2780.3,-447.11 2814.63,-447.11 2838.13,-470.61 2879.8,-470.61
  Top w20: v1(-467.2,-1395.61) -457.2,-1405.61 R19.2@-290.2,-1405.61 ; v1(1002.8,-745.61) 1107.8,-850.61 2172.8,-850.61 v1(2197.8,-875.61)
  Top w25: 2502.8,-1015.61 2552.8,-1015.61 2617.8,-1015.61
  Top w30: 1552.92,-1370.61 1627.8,-1370.61 1657.8,-1340.61 ; 1667.8,-1181.61 1667.8,-1330.61 1657.8,-1340.61 ; 2502.8,-1015.61 2437.8,-1015.61 2414.3,-1039.11 2356.63,-1039.11 2300.13,-1095.61 v1(2192.8,-1095.61) 1902.8,-1095.61 1817.8,-1180.61 1817.8,-1305.89 1783.08,-1340.61 1657.8,-1340.61 ; 2617.8,-1015.61 2772.8,-1015.61 2887.8,-900.61 2887.8,-680.61 ; R4.2@2782.8,-682.61 C13.1@2842.8,-682.61 ; C13.1@2842.8,-682.61 2844.8,-680.61 2887.8,-680.61 ; C13.1@2842.8,-682.61 2879.8,-645.61 2879.8,-610.61 2879.8,-672.61 2887.8,-680.61
  Bottom w10: v2(1440.73,-247.68) 1429.04,-259.37 v2(1429.04,-311.85) 1487.8,-370.61 ; W1.VDD33@1479.94,-493.07 v1(1526.35,-493.07) ; W1.VDD33@1484.3,-475.61 1484.3,-374.11 1487.8,-370.61 ; v1(1883.71,-235.61) 1676.94,-235.61 v1(1639.87,-272.68) 1639.87,-281.8 1583.89,-337.78 1583.89,-349.52 1562.8,-370.61 1487.8,-370.61
  Bottom w12: TP4.TP@-697.2,-745.61 v1@-647.2,-745.61
  Bottom w20: v1(1002.8,-745.61) 1002.8,-645.61 1067.8,-580.61 1457.8,-580.61 1482.8,-555.61 1482.8,-492.21 W1.VDD33@1480.68,-490.1 ; W1.VDD33@1479.94,-493.07 W1.VDD33@1480.68,-490.1 ; W1.VDD33@1484.3,-475.61 W1.VDD33@1480.68,-490.1 ; v1(2192.8,-1095.61) 2197.8,-1090.61 v1(2197.8,-875.61)
  Bottom w30: v1(-630.2,-748.61) -633.2,-745.61 -647.2,-745.61 -782.2,-745.61 -818.76,-782.17 -818.76,-1097.17 -760.33,-1155.61 -587.2,-1155.61 -467.2,-1275.61 v1(-467.2,-1395.61) -467.2,-1435.61 -433.07,-1469.74 463.67,-1469.74 501.49,-1431.92 720.99,-1431.92 724.89,-1435.83 1652.58,-1435.83 1677.8,-1410.61 v1(1677.8,-1195.61)
  other v1: 1652.8,-1195.61 1702.8,-1195.61 1652.8,-1170.61 1677.8,-1170.61 1702.8,-1170.61 1652.8,-1145.61 1677.8,-1145.61 1702.8,-1145.61 -649.2,-767.61 -630.2,-767.61 -649.2,-748.61 -649.2,-729.61 -630.2,-729.61
+5V: C28.1 C29.1 C30.1 C31.1 J1.A01 J1.A02 J1.B01 J1.B02 J1.C01 J1.C02 J1.D01 J1.D02 L2.P$1 R22.2 TP5.TP U4.P$7 X2.26 X2.27 X2.28 X2.29 X2.30 | length 1276.2
  Top w10: R22.2@159.8,-1365.61 159.8,-1253.61 167.8,-1245.61
  Top w50: X2.30@-584.25,-906.04 v2(-545.94,-944.35) -362.2,-1128.09 -362.2,-1180.61 -326.11,-1216.7 -245.1,-1216.7 -167.24,-1294.56 -167.24,-1295.57 -94.22,-1368.59 104.82,-1368.59 167.8,-1305.61 167.8,-1245.61 167.8,-1205.61
  Bottom w12: TP5.TP@-597.2,-945.61 -595.94,-944.35 v2(-545.94,-944.35)
+12V: C19.1 C23.1 C24.1 R11.1 TP12.TP TP13.TP U4.P$1 X2.1 X2.2 X2.3 X2.4 X2.5 X2.6 | length 4134.5
  Top w6: -398.6,-784.61 -398.6,-903.21 -389.2,-912.61
  Top w10: -398.6,-784.61 -398.6,-782.01 v1(-337.2,-720.61) ; -363.81,-509 C23.1@-329.44,-509 ; v1(-297.2,-435.61) -297.2,-476.75 C23.1@-329.44,-509 ; C24.1@-257.71,-509 C23.1@-329.44,-509 ; R11.1@807.8,-1403.61 841.4,-1403.61 860.8,-1423.01 902.8,-1381.01 902.8,-1360.61 952.8,-1310.61 1062.8,-1310.61 1097.8,-1275.61 1097.8,-990.61 1112.8,-975.61
  Top w15: C19.1@1255.8,-1050.61 C19.1@1266.5,-1049.31
  Top w45: v1(-441.2,-298.61) -441.2,-248.61 -393.2,-200.61 7.8,-200.61 52.8,-245.61 52.8,-355.61 117.8,-420.61 427.8,-420.61 537.8,-530.61 537.8,-755.61 652.8,-870.61 1007.8,-870.61 1112.8,-975.61 1262.8,-975.61 1277.8,-990.61 1277.8,-1038.01 C19.1@1266.5,-1049.31
  Top w83: v1(-440.2,-318.61) -440.2,-432.61 -363.81,-509
  Bottom w10: v1(-337.2,-720.61) -302.2,-720.61 -282.2,-700.61 -282.2,-470.61 -297.2,-455.61 v1(-297.2,-435.61)
  Bottom w50: TP12.TP@-493.2,-247.61 TP13.TP@-393.2,-247.61
  other v1: -460.2,-318.61 -421.2,-318.61 -401.2,-318.61 -461.2,-298.61 -421.2,-298.61 -401.2,-298.61
ADC_AVDD: R4.1 U2.43 | length 272.3
  Top w6: U2.43@2764.8,-527.99 2767.8,-530.98 v1@2767.8,-545.61
  Top w7: 2767.8,-533.11 U2.43@2767.8,-530.98
  Top w8: 2722.8,-682.61 2726.8,-682.61 R4.1@2782.8,-738.61
  Top w10: 2722.8,-682.61 2722.8,-645.61 v1(2727.8,-640.61) ; v1(2767.8,-550.61) 2767.8,-545.61 2767.8,-533.11
  Bottom w8: v1(2727.8,-640.61) 2767.8,-600.61 v1(2767.8,-550.61)
BOOTSEL_MCU: J2.17
D_N: U5.4 | length 2002.8
  Top w7: U5.4@1615.38,-394.05 1638.01,-416.67 1643.66,-416.67 1702.8,-475.81 1702.8,-577.58 1729.03,-603.81 v1(1906,-603.81)
  Top w13: 3007.8,-588.61 3031.52,-588.61 v1(3043.16,-600.25)
  Bottom w7: v1(1906,-603.81) 1917,-592.81 2115,-592.81 2309.8,-787.61 2321.15,-787.61 cw(c2321.15,-797.36) 2330.9,-797.36 2330.9,-803.07 ccw(c2340.65,-803.07) 2340.65,-812.82 2340.89,-812.82 ccw(c2340.89,-803.07) 2350.64,-803.07 2350.64,-797.36 cw(c2360.39,-797.36) 2360.39,-787.61 2360.63,-787.61 cw(c2360.63,-797.36) 2370.38,-797.36 2370.38,-803.07 ccw(c2380.13,-803.07) 2380.13,-812.82 2380.37,-812.82 ccw(c2380.37,-803.07) 2390.12,-803.07 2390.12,-797.36 cw(c2399.87,-797.36) 2399.87,-787.61 2400.11,-787.61 cw(c2400.11,-797.36) 2409.86,-797.36 2409.86,-803.07 ccw(c2419.61,-803.07) 2419.61,-812.82 2419.86,-812.82 ccw(c2419.86,-803.07) 2429.61,-803.07 2429.61,-797.36 cw(c2439.36,-797.36) 2439.36,-787.61 2439.6,-787.61 cw(c2439.6,-797.36) 2449.35,-797.36 2449.35,-803.07 ccw(c2459.1,-803.07) 2459.1,-812.82 2459.34,-812.82 ccw(c2459.34,-803.07) 2469.09,-803.07 2469.09,-797.36 cw(c2478.84,-797.36) 2478.84,-787.61 2479.08,-787.61 cw(c2479.08,-797.36) 2488.83,-797.36 2488.83,-803.07 ccw(c2498.58,-803.07) 2498.58,-812.82 2498.82,-812.82 ccw(c2498.82,-803.07) 2508.57,-803.07 2508.57,-797.36 cw(c2518.32,-797.36) 2518.32,-787.61 2518.56,-787.61 cw(c2518.56,-797.36) 2528.31,-797.36 2528.31,-803.07 ccw(c2538.06,-803.07) 2538.06,-812.82 2538.3,-812.82 ccw(c2538.3,-803.07) 2548.05,-803.07 2548.05,-797.36 cw(c2557.8,-797.36) 2557.8,-787.61 2842.77,-787.61 2949.77,-680.61 3002.8,-680.61 3043.16,-640.25 v1(3043.16,-600.25)
D_P: U5.5 | length 1954.8
  Top w7: U5.5@1629.52,-379.9 1629.52,-385.56 1714.8,-470.84 1714.8,-572.61 1732.8,-590.61 1872.8,-590.61 v1(1882.8,-580.61)
  Top w13: 3007.8,-427.61 3051.52,-427.61 v1(3058.66,-434.75)
  Bottom w7: v1(1882.8,-580.61) 2119.77,-580.61 2314.77,-775.61 2837.8,-775.61 2944.8,-668.61 2987.8,-668.61 3012.8,-643.61 3012.8,-495.61 3058.66,-449.75 v1(3058.66,-434.75)
EN_3V3_BUCK:  | length 60.7
  Top w10: 936.8,-1385.61 949.4,-1385.61 987.8,-1414.61
EN_VOXL: R20.2 U4.P$13 | length 967.8
  Top w7: U4.P$13@-162.95,-490.49 -162.95,-421.36
  Top w8: -162.95,-421.36 -142.2,-400.61
  Top w10: -361.2,-860.61 -361.2,-773.8 -329.13,-741.74 -268.33,-741.74 v1(-267.2,-740.61) ; R20.2@-269.2,-410.61 -269.2,-382.61 v1(-259.8,-373.21) -208.22,-321.63 -208.22,-302.56 -200.68,-295.02 -148.52,-295.02 -142.2,-301.34 -142.2,-400.61
  Bottom w10: v1(-267.2,-740.61) -267.2,-380.61 v1(-259.8,-373.21)

## Text inside footprints (layer, text, board x,y; h text height)
D2: Measures "0.071in/1.803mm" at 2085.8,-676.61 h38.75 r270; Measures "0.053in/1.346mm" at 2245.8,-1091.61 h38.75 r270; Measures "0.016in/0.406mm" at 2245.8,-1008.61 h38.75 r270; Measures "0.018in/0.457mm" at 2335.8,-636.61 h38.75 r270; Measures "0.106in/2.692mm" at 2435.8,-676.61 h38.75 r270; Measures "Alt 2 Padstyle: OX90Y60D30P" at 1774.8,-252.61 h77.5 r270; Measures "Alt 1 Padstyle: OX60Y90D30P" at 1849.8,-252.61 h77.5 r270; Measures "Default Padstyle: RX41p5Y16D0T" at 1924.8,-191.61 h77.5 r270
D3: Measures "0.071in/1.803mm" at 2664.8,-829.61 h38.75 r90; Measures "0.053in/1.346mm" at 2504.8,-414.61 h38.75 r90; Measures "0.016in/0.406mm" at 2504.8,-497.61 h38.75 r90; Measures "0.018in/0.457mm" at 2414.8,-869.61 h38.75 r90; Measures "0.106in/2.692mm" at 2314.8,-829.61 h38.75 r90; Measures "Alt 2 Padstyle: OX90Y60D30P" at 2975.8,-1253.61 h77.5 r90; Measures "Alt 1 Padstyle: OX60Y90D30P" at 2900.8,-1253.61 h77.5 r90; Measures "Default Padstyle: RX41p5Y16D0T" at 2825.8,-1314.61 h77.5 r90
D4: Measures "0.071in/1.803mm" at 2764.8,-1174.61 h38.75 r90; Measures "0.053in/1.346mm" at 2604.8,-759.61 h38.75 r90; Measures "0.016in/0.406mm" at 2604.8,-842.61 h38.75 r90; Measures "0.018in/0.457mm" at 2514.8,-1214.61 h38.75 r90; Measures "0.106in/2.692mm" at 2414.8,-1174.61 h38.75 r90; Measures "Alt 2 Padstyle: OX90Y60D30P" at 3075.8,-1598.61 h77.5 r90; Measures "Alt 1 Padstyle: OX60Y90D30P" at 3000.8,-1598.61 h77.5 r90; Measures "Default Padstyle: RX41p5Y16D0T" at 2925.8,-1659.61 h77.5 r90
D5: Measures "0.112in/2.845mm" at 1947.8,-1514.61 h38.75 r90; Measures "0.071in/1.803mm" at 1779.8,-1079.61 h38.75 r90; Measures "0.028in/0.711mm" at 1779.8,-1159.61 h38.75 r90; Measures "0.02in/0.508mm" at 1683.8,-1569.61 h38.75 r90; Measures "0.152in/3.861mm" at 1583.8,-1514.61 h38.75 r90; Measures "Alt 2 Padstyle: OX90Y60D30P" at 2256.8,-1938.61 h77.5 r90; Measures "Alt 1 Padstyle: OX60Y90D30P" at 2181.8,-1938.61 h77.5 r90; Measures "Default Padstyle: RX36Y28D0T" at 2106.8,-1954.61 h77.5 r90; tDocu "*" at 1792.8,-1424.61 h77.5 r90
D6: Measures "0.112in/2.845mm" at 2037.8,-1514.61 h38.75 r90; Measures "0.071in/1.803mm" at 1869.8,-1079.61 h38.75 r90; Measures "0.028in/0.711mm" at 1869.8,-1159.61 h38.75 r90; Measures "0.02in/0.508mm" at 1773.8,-1569.61 h38.75 r90; Measures "0.152in/3.861mm" at 1673.8,-1514.61 h38.75 r90; Measures "Alt 2 Padstyle: OX90Y60D30P" at 2346.8,-1938.61 h77.5 r90; Measures "Alt 1 Padstyle: OX60Y90D30P" at 2271.8,-1938.61 h77.5 r90; Measures "Default Padstyle: RX36Y28D0T" at 2196.8,-1954.61 h77.5 r90; tDocu "*" at 1882.8,-1424.61 h77.5 r90
D7: Measures "0.071in/1.803mm" at 2388.8,-1017.61 h38.75; Measures "0.053in/1.346mm" at 2803.8,-857.61 h38.75; Measures "0.016in/0.406mm" at 2720.8,-857.61 h38.75; Measures "0.018in/0.457mm" at 2348.8,-767.61 h38.75; Measures "0.106in/2.692mm" at 2388.8,-667.61 h38.75; Measures "Alt 2 Padstyle: OX90Y60D30P" at 1964.8,-1328.61 h77.5; Measures "Alt 1 Padstyle: OX60Y90D30P" at 1964.8,-1253.61 h77.5; Measures "Default Padstyle: RX41p5Y16D0T" at 1903.8,-1178.61 h77.5
D9: Measures "0.071in/1.803mm" at 2429.8,-1119.61 h38.75 r90; Measures "0.053in/1.346mm" at 2269.8,-704.61 h38.75 r90; Measures "0.016in/0.406mm" at 2269.8,-787.61 h38.75 r90; Measures "0.018in/0.457mm" at 2179.8,-1159.61 h38.75 r90; Measures "0.106in/2.692mm" at 2079.8,-1119.61 h38.75 r90; Measures "Alt 2 Padstyle: OX90Y60D30P" at 2740.8,-1543.61 h77.5 r90; Measures "Alt 1 Padstyle: OX60Y90D30P" at 2665.8,-1543.61 h77.5 r90; Measures "Default Padstyle: RX41p5Y16D0T" at 2590.8,-1604.61 h77.5 r90
J2: Measures "0in/0mm" at 524.4,218.14 h38.75; Measures "0.185in/4.699mm" at 566.4,-410.86 h38.75; Measures "0.1in/2.54mm" at 142.4,-410.86 h38.75; Measures "0.665in/16.891mm" at 430.4,-510.86 h38.75; Measures "0.25in/6.35mm" at 464.4,-410.86 h38.75; Measures "-0.08in/-2.032mm" at 1134.4,-135.86 h38.75; Measures "0.032in/0.813mm" at -351.6,-219.86 h38.75; Measures "0.364in/9.246mm" at 623.4,-710.86 h38.75; Measures "0.788in/20.015mm" at 430.4,-810.86 h38.75; Measures "1.184in/30.074mm" at 1022.4,-610.86 h38.75; Measures "0.28in/7.112mm" at 1334.4,-95.86 h38.75; Measures "0.02in/0.5mm" at 751.4,218.14 h38.75; Measures "0.235in/5.969mm" at -251.6,-95.86 h38.75; Measures "Alt 2 Padstyle: OX90Y60D30P" at 17.4,-1440.86 h77.5; Measures "Alt 1 Padstyle: EX40Y40D40P" at 17.4,-1365.86 h77.5; Measures "Keying Padstyle: EX60Y60D40P" at -12.6,-1290.86 h77.5; Measures "2nd Center Padstyle: RX100Y25D0T" at -103.6,-1215.86 h77.5; Measures "1st Center Padstyle: RX185Y25D0T" at -96.6,-1140.86 h77.5; Measures "Mounting Hole Padstyle: EX60Y60D40P" at -156.6,-990.86 h77.5; Measures "Default Padstyle: RX8Y72D0T" at 24.4,-915.86 h77.5; tDocu "2" at 892.4,78.14 h77.5; tDocu "1" at 892.4,-305.86 h77.5; tDocu "60" at 240.4,78.14 h77.5; tDocu "59" at 240.4,-305.86 h77.5; tPlace "2" at 892.4,78.14 h77.5; tPlace "1" at 892.4,-305.86 h77.5; tPlace "60" at 240.4,78.14 h77.5; tPlace "59" at 240.4,-305.86 h77.5